# Altium PCB PCI Express Mini L1_V2.PCBDOC (part 6 of 9)
Units mm, origin at the board's own origin, x right, y up, seen from the top; angles counter-clockwise.
Board outline 70 x 83.2 mm, 6 copper layers (TopLayer, Layer 1, Layer 2, Layer 3, Layer 4, Bottom Layer), stack 0.893 mm thick; 442 components, 259 nets, 1412 pads, 870 vias.
Unrouted connection lines stored in the file: 2.
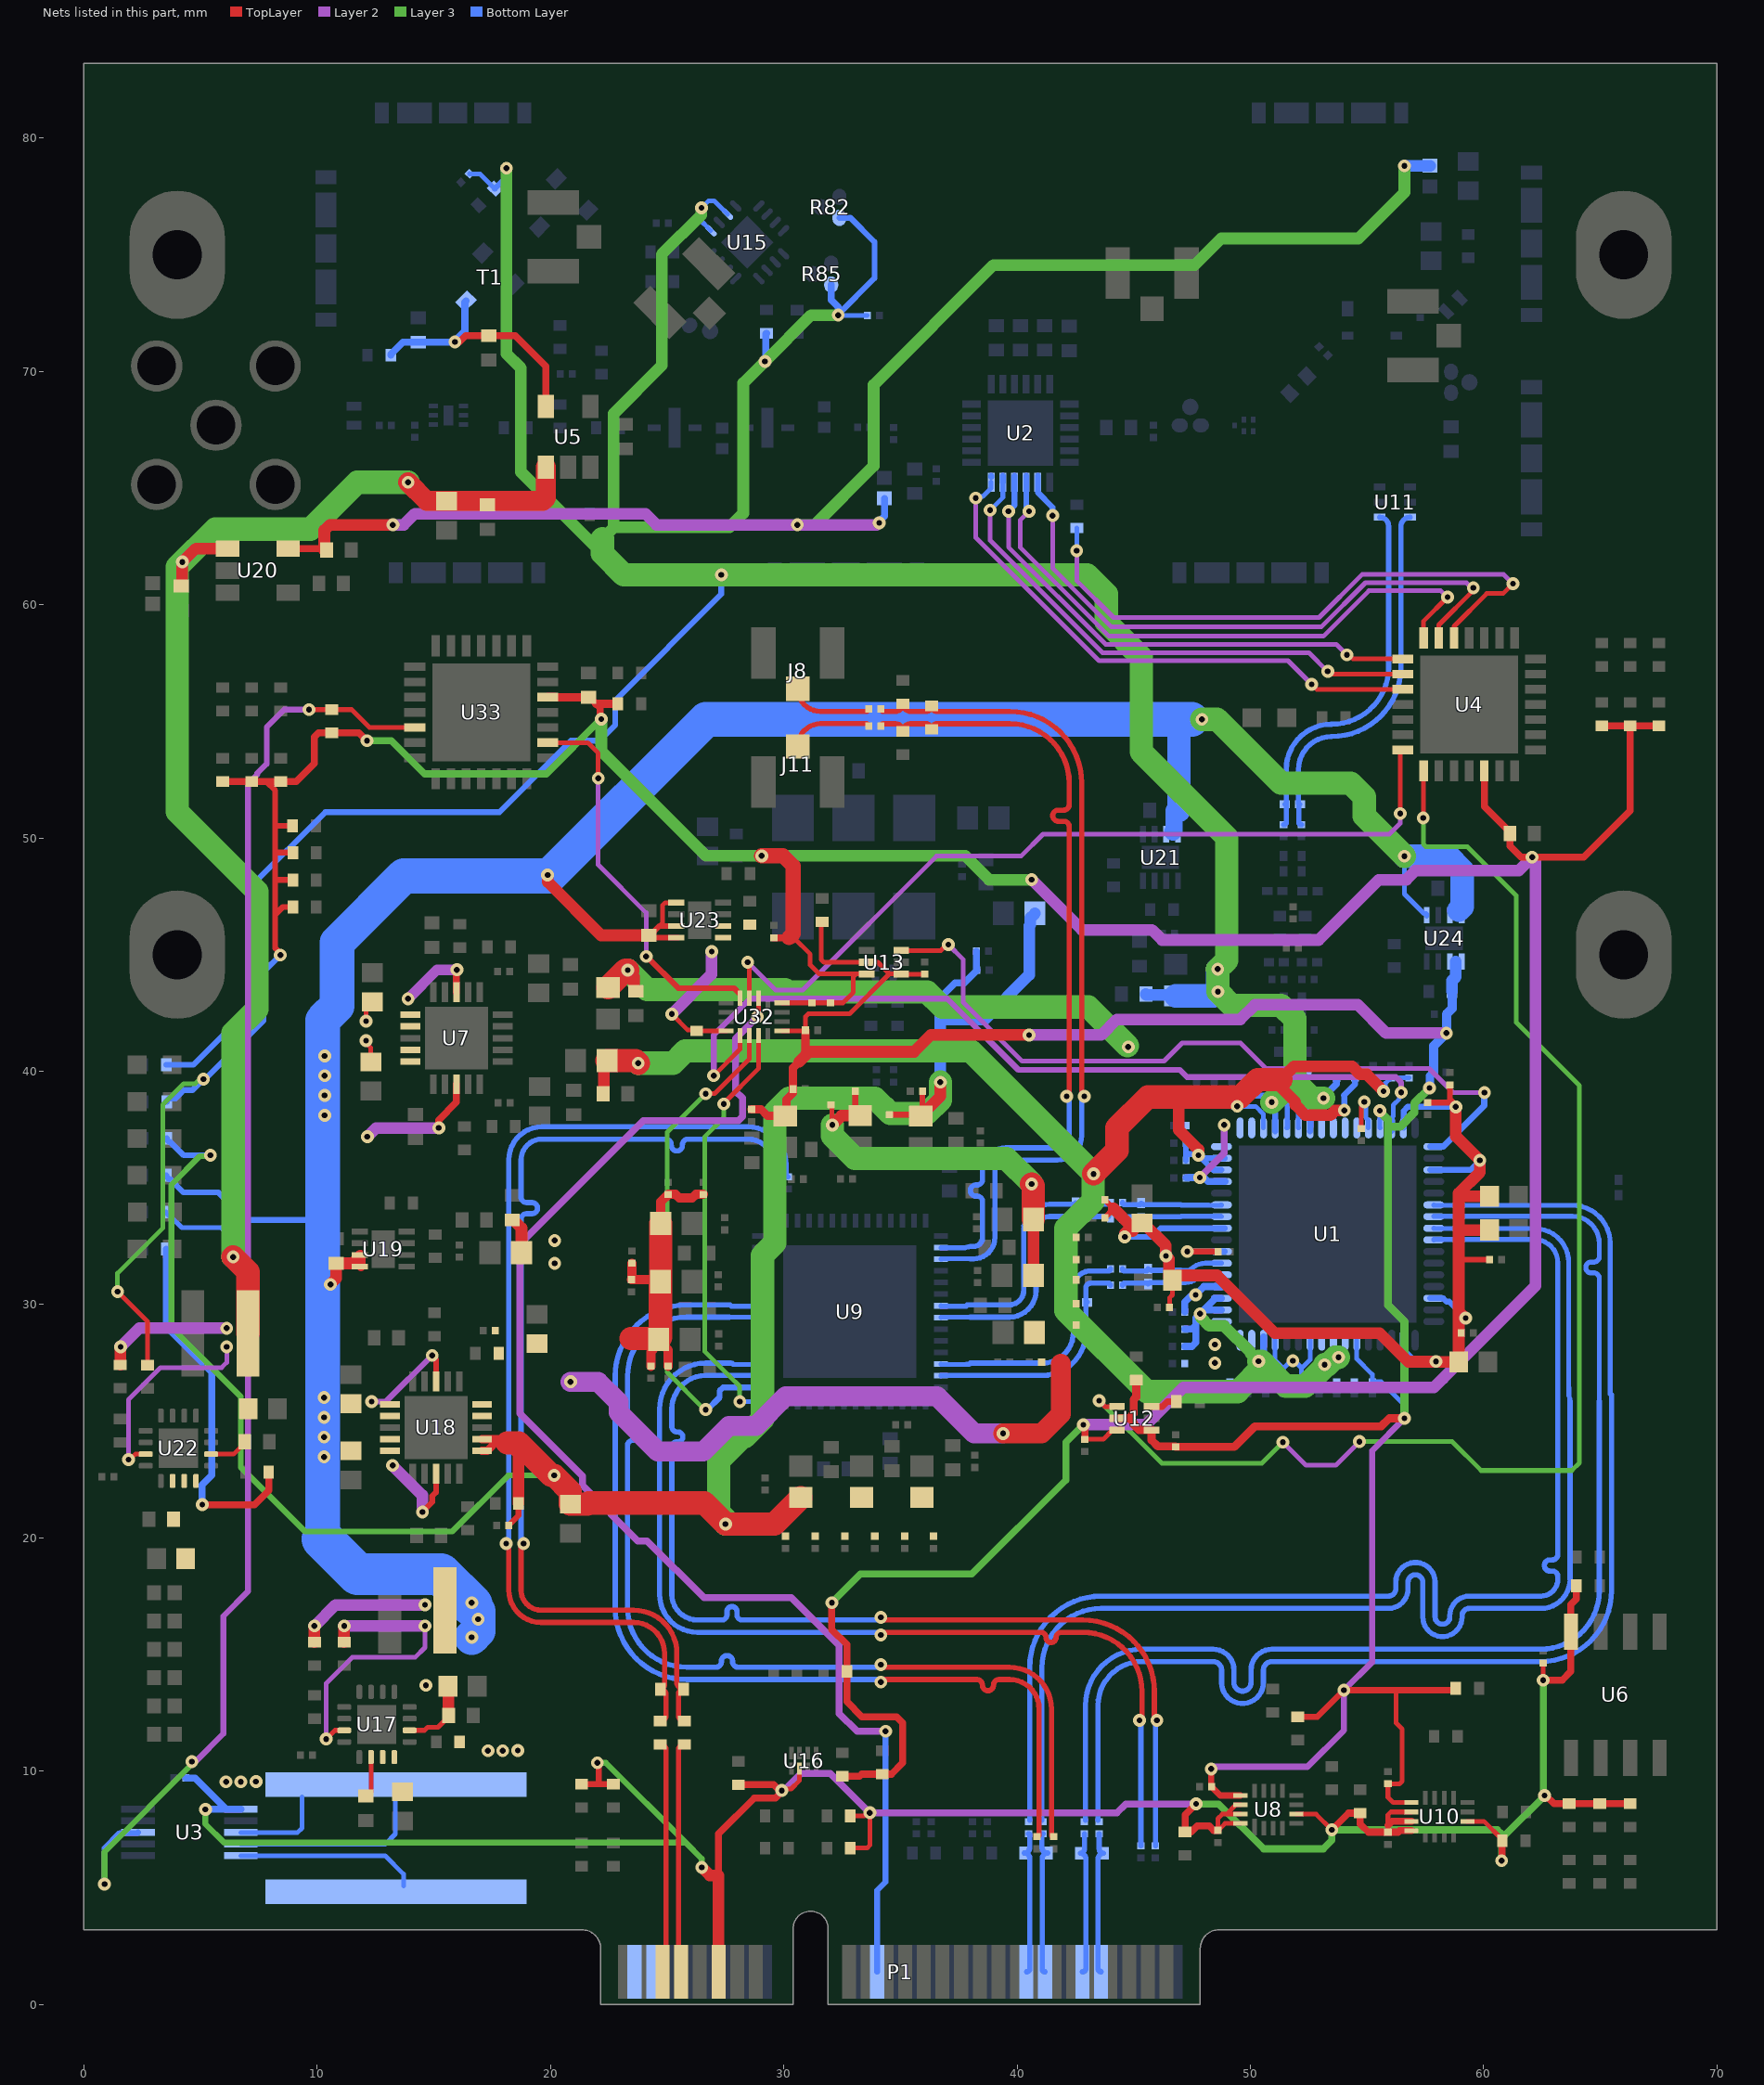
[diagram p7: the nets of this part, all layers, seen from the top]

## Part data (continued)
U12 U13: "TXB0101 (LVC1T55) DRLT Setup", Case/Package=SOT-553-6, High Level Output Current=-20uA, Low Level Output Current=20uA, Manufacturer="Texas Instruments", Max Operating Temperature=85°C, Max Supply Voltage=5.5V, Min Operating Temperature=-40°C, Min Supply Voltage=1.65V, Package Quantity=1, Supplier Part Number 1=296-32600-1-ND, Category="Integrated Circuits (ICs)", ComponentLink1Description=https://datasheet.ciiva.com/15096/getdatasheetpartid-539440-15096428.pdf?src-supplier=Verical, ComponentLink1URL=https://datasheet.ciiva.com/15096/getdatasheetpartid-539440-15096428.pdf?src-supplier=Verical, ComponentLink2Description=https://datasheet.ciiva.com/6615/txb0101-6615081.pdf?src-supplier=Digi-Key, ComponentLink2URL=https://datasheet.ciiva.com/6615/txb0101-6615081.pdf?src-supplier=Digi-Key, ComponentLink3Description=https://datasheet.ciiva.com/6615/txb0101-6615083.pdf?src-supplier=Digi-Key, ComponentLink3URL=https://datasheet.ciiva.com/6615/txb0101-6615083.pdf?src-supplier=Digi-Key, ComponentLink4Description=https://datasheet.ciiva.com/6615/txb0101-6615084.pdf?src-supplier=Digi-Key, ComponentLink4URL=https://datasheet.ciiva.com/6615/txb0101-6615084.pdf?src-supplier=Digi-Key, Contact Plating=Gold, Data Rate=100Mbps, Height=0.55mm, Lead Free="Lead Free", Length=1.7mm, Logic Function=Translator, Manufacturer Part Number=TXB0101DRLT, Mount="Surface Mount", Number of Bits=1, Number of Channels=1, Number of Pins=6, Packaging="Tape and Reel", Pricing 1="1=0,56000, 10=0,49500, 25=0,46520, 100=0,37950 (USD)", Propagation Delay=4ns, Radiation Hardening=No, RoHS=Yes, Stock 1=1962, Supplier 1=Digi-Key, Turn-On Delay Time=31ns, Weight=9.9E-05oz, Width=1.3mm
U14: Frequency="DC - 3.5GHz", Supplier Part Number 1=BGA616H6327XTSA1CT-ND, Supplier 1=Digi-Key
U15: "RF Detector 0MHz to 6000MHz 16-Pin LFCSP EP T/R", Manufacturer="Analog Devices", Operating Supply Current=4mA, Supplier Part Number 1=ADL5910ACPZN-R7CT-ND, Category="RF Semiconductors and Devices", ComponentLink1Description=https://www.analog.com/media/en/technical-documentation/data-sheets/ADL5910.pdf?src-supplier=Digi-Key, ComponentLink1URL=https://www.analog.com/media/en/technical-documentation/data-sheets/ADL5910.pdf?src-supplier=Digi-Key, Manufacturer Part Number=ADL5910ACPZN-R7, Number of Pins=16, Packaging="Cut Tape", Pricing 1="1=5,17000, 10=4,64100, 25=4,38760, 100=3,80250, 250=3,60752, 500=3,23700 (USD)", RoHS=No, Stock 1=1503, Supplier 1=Digi-Key
U16: "TEXAS INSTRUMENTS   PCA9306DQER.   IC, SMBus, 5V, X2SON-8", Low Level Output Current=128mA, Manufacturer 1="Texas Instruments", Max Operating Temperature=85°C, Max Supply Voltage=5V, Min Operating Temperature=-40°C, Min Supply Voltage=0uV, Package Quantity=1, Supplier Part Number 1=296-27957-1-ND, ComponentLink1Description=https://datasheet.ciiva.com/22631/1719693-22631024.pdf?src-supplier=Element14, ComponentLink1URL=https://datasheet.ciiva.com/22631/1719693-22631024.pdf?src-supplier=Element14, ComponentLink2Description=https://datasheet.ciiva.com/1899/pca9306-1899328.pdf?src-supplier=Digi-Key, ComponentLink2URL=https://datasheet.ciiva.com/1899/pca9306-1899328.pdf?src-supplier=Digi-Key, ComponentLink3Description=https://datasheet.ciiva.com/15095/getdatasheetpartid-306496-15095555.pdf?src-supplier=Verical, ComponentLink3URL=https://datasheet.ciiva.com/15095/getdatasheetpartid-306496-15095555.pdf?src-supplier=Verical, ComponentLink4Description=https://datasheet.ciiva.com/1504/1862428-1504149.pdf?src-supplier=Element14, ComponentLink4URL=https://datasheet.ciiva.com/1504/1862428-1504149.pdf?src-supplier=Element14, ComponentLink5Description=https://datasheet.ciiva.com/1899/pca9306-1899326.pdf?src-supplier=Digi-Key, ComponentLink5URL=https://datasheet.ciiva.com/1899/pca9306-1899326.pdf?src-supplier=Digi-Key, ComponentLink6Description=https://datasheet.ciiva.com/14287/pca9306-14287374.pdf?src-supplier=Avnet, ComponentLink6URL=https://datasheet.ciiva.com/14287/pca9306-14287374.pdf?src-supplier=Avnet, ComponentLink7Description=https://datasheet.ciiva.com/14287/pca9306-14287470.pdf?src-supplier=Avnet, ComponentLink7URL=https://datasheet.ciiva.com/14287/pca9306-14287470.pdf?src-supplier=Avnet, ComponentLink8Description=https://datasheet.ciiva.com/1899/pca9306-1899327.pdf?src-supplier=Digi-Key, ComponentLink8URL=https://datasheet.ciiva.com/1899/pca9306-1899327.pdf?src-supplier=Digi-Key, ComponentLink9Description=https://datasheet.ciiva.com/26041/pca9306-26041014.pdf?src-supplier=Avnet+Europe, ComponentLink9URL=https://datasheet.ciiva.com/26041/pca9306-26041014.pdf?src-supplier=Avnet+Europe, Height=0.35mm, Lead Free="Lead Free", Length=1.45mm, Logic Function=Translator, Manufacturer Part Number 1=PCA9306DQER, Number of Bits=2, Number of Channels=2, Number of Outputs=2, Number of Pins=8, Output Type=I2C, Packaging="Tape and Reel", Pricing 1="1=0,67000, 10=0,59100, 100=0,45340, 500=0,35844, 1000=0,28675 (USD)", Propagation Delay=0.3ns, Radiation Hardening=No, REACH SVHC="No SVHC", RoHS=Yes, Stock 1=25002, Supplier 1=Digi-Key, Turn-On Delay Time=1.4ns, Width=1.05mm
U17 U22: "IC REG BUCK ADJ 3A SYNC 16QFN", Case/Package=QFN, Manufacturer="Texas Instruments", Max Input Voltage=17V, Max Operating Temperature=125°C, Max Output Current=3A, Max Output Voltage=6V, Min Input Voltage=3V, Min Operating Temperature=-40°C, Min Output Voltage=900mV, Package Quantity=3000, Quiescent Current=17uA, Supplier Part Number 1=296-37682-1-ND, Switching Frequency=2.5MHz, Category="Voltage Regulators - Switching", ComponentLink1Description=https://datasheet.ciiva.com/4880/slvsag7-121391-4880626.pdf?src-supplier=Mouser, ComponentLink1URL=https://datasheet.ciiva.com/4880/slvsag7-121391-4880626.pdf?src-supplier=Mouser, ComponentLink2Description=https://datasheet.ciiva.com/14377/tps62130-14377867.pdf?src-supplier=Avnet, ComponentLink2URL=https://datasheet.ciiva.com/14377/tps62130-14377867.pdf?src-supplier=Avnet, ComponentLink3Description=https://datasheet.ciiva.com/41799/tps62130-41799070.pdf?src-supplier=Digi-Key, ComponentLink3URL=https://datasheet.ciiva.com/41799/tps62130-41799070.pdf?src-supplier=Digi-Key, Contact Plating=Gold, Lead Free="Lead Free", Manufacturer Part Number=TPS62130RGTR, Number of Outputs=1, Number of Pins=16, Operating Supply Voltage=17V, Output Configuration=Positive, Output Current=3A, Output Type=Adjustable, Output Voltage=6V, Packaging="Tape and Reel", Pricing 1="1=2,07000, 10=1,85500, 25=1,75000, 100=1,40000, 250=1,22500, 500=1,19000, 1000=0,94500 (USD)", REACH SVHC="No SVHC", RoHS=Yes, Stock 1=11646, Supplier 1=Digi-Key, Synchronous Rectifier=Yes
U19 U21 U23 U24: "IC REG LIN POS ADJ 500MA 8LFCSP", Case/Package=MSOP, Dropout Voltage=130mV, Manufacturer="Analog Devices", Max Input Voltage=5.5V, Max Operating Temperature=125°C, Max Output Current=500mA, Max Output Voltage=5V, Max Supply Current=210uA, Min Current Limit=550mA, Min Input Voltage=2.3V, Min Operating Temperature=-40°C, Min Output Voltage=800mV, Nominal Supply Current=45uA, Power Supply Rejection Ratio (PSRR)=60dB, Reference Voltage=500mV, Supplier Part Number 1=2457144, Accuracy=1%, ComponentLink1Description=https://datasheet.ciiva.com/17365/adp124-125-17365589.pdf?src-supplier=Avnet+Europe, ComponentLink1URL=https://datasheet.ciiva.com/17365/adp124-125-17365589.pdf?src-supplier=Avnet+Europe, ComponentLink2Description=https://datasheet.ciiva.com/2056/adp124-125-2056955.pdf?src-supplier=Digi-Key, ComponentLink2URL=https://datasheet.ciiva.com/2056/adp124-125-2056955.pdf?src-supplier=Digi-Key, ComponentLink3Description=https://datasheet.ciiva.com/2056/adp124-125-2056954.pdf?src-supplier=Digi-Key, ComponentLink3URL=https://datasheet.ciiva.com/2056/adp124-125-2056954.pdf?src-supplier=Digi-Key, ComponentLink4Description=https://datasheet.ciiva.com/2056/adp124-125-2056956.pdf?src-supplier=Digi-Key, ComponentLink4URL=https://datasheet.ciiva.com/2056/adp124-125-2056956.pdf?src-supplier=Digi-Key, ComponentLink5Description=https://datasheet.ciiva.com/48694/001251247-da-01-en-ic-reg-l-adj-adp125acpz-r7-lfcspud-8-adi-48694599.pdf?src-supplier=Conrad, ComponentLink5URL=https://datasheet.ciiva.com/48694/001251247-da-01-en-ic-reg-l-adj-adp125acpz-r7-lfcspud-8-adi-48694599.pdf?src-supplier=Conrad, ComponentLink6Description=http://datasheet.octopart.com/ADP125ACPZ-R7-Analog-Devices-datasheet-11525030.pdf?src-supplier=Newark, ComponentLink6URL=http://datasheet.octopart.com/ADP125ACPZ-R7-Analog-Devices-datasheet-11525030.pdf?src-supplier=Newark, ComponentLink7Description=http://datasheet.octopart.com/ADP125ACPZ-R7-Analog-Devices-datasheet-38878834.pdf?src-supplier=Newark, ComponentLink7URL=http://datasheet.octopart.com/ADP125ACPZ-R7-Analog-Devices-datasheet-38878834.pdf?src-supplier=Newark, ComponentLink8Description=http://datasheet.octopart.com/ADP125ACPZ-R7-Analog-Devices-datasheet-10623001.pdf?src-supplier=Analog+Devices, ComponentLink8URL=http://datasheet.octopart.com/ADP125ACPZ-R7-Analog-Devices-datasheet-10623001.pdf?src-supplier=Analog+Devices, ComponentLink9Description=http://datasheet.octopart.com/ADP125ACPZ-R7-Analog-Devices-datasheet-8638579.pdf?src-supplier=Analog+Devices, ComponentLink9URL=http://datasheet.octopart.com/ADP125ACPZ-R7-Analog-Devices-datasheet-8638579.pdf?src-supplier=Analog+Devices, ComponentLink10Description=http://datasheet.octopart.com/ADP125ACPZ-R7-Analog-Devices-datasheet-11776558.pdf?src-supplier=Arrow, ComponentLink10URL=http://datasheet.octopart.com/ADP125ACPZ-R7-Analog-Devices-datasheet-11776558.pdf?src-supplier=Arrow, Contact Plating=Gold, Height=0.6mm, Lead Free="Contains Lead", Length=2mm, Manufacturer 2="Analog Devices", Manufacturer Part Number=ADP125ACPZ-R7, Manufacturer Part Number 2=ADP125ACPZ-R7, Number of Outputs=1, Number of Pins=8, Number of Regulators=1, Operating Supply Current=45uA, Output Current=500mA, Output Type=Adjustable, Output Voltage=5V, Packaging="Tape and Reel", Polarity=Positive, Pricing 2="1=1.39000, 10=1.23900, 25=1.17600, 100=0.96600, 250=0.90300, 500=0.79800, 1000=0.63000 (USD)", Quiescent Current=45uA, REACH SVHC="No SVHC", RoHS=Yes, Stock 1=261, Stock 2=12322, Supplier 1=Farnell, Supplier 2=Digi-Key, Supplier Part Number 2=ADP125ACPZ-R7CT-ND, Width=2mm
U32: "IC TRNSLTR BIDIRECTIONAL 16UQFN", High Level Output Current=-20uA, Low Level Output Current=20uA, Manufacturer 1="Texas Instruments", Max Operating Temperature=85°C, Max Supply Voltage=3.6V, Min Operating Temperature=-40°C, Min Supply Voltage=900mV, Nominal Supply Current=5uA, Package Quantity=1, Quiescent Current=10uA, Supplier Part Number 1=296-29681-1-ND, ComponentLink1Description=https://datasheet.ciiva.com/1900/txb0304-1900817.pdf?src-supplier=Digi-Key, ComponentLink1URL=https://datasheet.ciiva.com/1900/txb0304-1900817.pdf?src-supplier=Digi-Key, ComponentLink2Description=https://datasheet.ciiva.com/15096/getdatasheetpartid-490462-15096317.pdf?src-supplier=Verical, ComponentLink2URL=https://datasheet.ciiva.com/15096/getdatasheetpartid-490462-15096317.pdf?src-supplier=Verical, ComponentLink3Description=https://datasheet.ciiva.com/1900/txb0304-1900818.pdf?src-supplier=Digi-Key, ComponentLink3URL=https://datasheet.ciiva.com/1900/txb0304-1900818.pdf?src-supplier=Digi-Key, ComponentLink4Description=https://datasheet.ciiva.com/1900/txb0304-1900819.pdf?src-supplier=Digi-Key, ComponentLink4URL=https://datasheet.ciiva.com/1900/txb0304-1900819.pdf?src-supplier=Digi-Key, ComponentLink5Description=https://datasheet.ciiva.com/14287/txb0304-14287243.pdf?src-supplier=Avnet, ComponentLink5URL=https://datasheet.ciiva.com/14287/txb0304-14287243.pdf?src-supplier=Avnet, Contact Plating=Gold, Data Rate=140Mbps, Lead Free="Lead Free", Logic Function=Translator, Manufacturer Part Number 1=TXB0304RSVR, Mount="Surface Mount", Number of Bits=4, Number of Channels=4, Number of Inputs=4, Number of Outputs=4, Number of Pins=16, Packaging="Tape and Reel", Pricing 1="1=1.45000, 10=1.29700, 100=1.01160, 500=0.83564, 1000=0.65972 (USD)", Propagation Delay=4.8ns, Radiation Hardening=No, REACH SVHC="No SVHC", RoHS=Yes, Stock 1=1758, Supplier 1=Digi-Key, Turn-On Delay Time=18.9ns
X1: "OSC VCXO 122.88MHZ LVPECL SMD", Case/Package=SMD/SMT, Frequency=122.88MHz, Manufacturer=Epson, Max Operating Temperature=85°C, Max Supply Current=65mA, Min Operating Temperature=-40°C, Supplier Part Number 1=SER3907CT-ND, ComponentLink1Description=https://datasheet.ciiva.com/29626/vg-4513ca-partnumber-29626986.pdf?src-supplier=Digi-Key, ComponentLink1URL=https://datasheet.ciiva.com/29626/vg-4513ca-partnumber-29626986.pdf?src-supplier=Digi-Key, ComponentLink2Description=https://datasheet.ciiva.com/29626/vg-4513ca-partnumber-29626987.pdf?src-supplier=Digi-Key, ComponentLink2URL=https://datasheet.ciiva.com/29626/vg-4513ca-partnumber-29626987.pdf?src-supplier=Digi-Key, ComponentLink3Description=https://datasheet.ciiva.com/29626/076-vg-4513ca-cb-e13ya-29626988.pdf?src-supplier=Digi-Key, ComponentLink3URL=https://datasheet.ciiva.com/29626/076-vg-4513ca-cb-e13ya-29626988.pdf?src-supplier=Digi-Key, Height=0.071inch, Lead Free="Lead Free", Length=0.276inch, Manufacturer Part Number=VG-4513CA122.8800M-GFCT3, Mount="Surface Mount", Packaging="Tape and Reel", Pricing 1="1 = 9,91000, 10 = 9,29000, 50 = 8,97980, 100 = 8,67020 (USD)", RoHS=Yes, Stock 1=438, Supplier 1=Digi-Key, Width=0.197inch

## Free pads (board coordinates)
  oval 4.1x5.5 hole 2.1 slot 4 at 90 deg unplated: ""(4,45) ""(4,75) ""(66,45) ""(66,75)

## Via types
v1: diameter 0.55, hole 0.25, TopLayer to Bottom Layer, tented both sides, 777 vias
v2: diameter 0.5, hole 0.2, TopLayer to Bottom Layer, 43 vias
v3: diameter 0.55, hole 0.25, TopLayer to Bottom Layer, 40 vias
v4: diameter 0.35, hole 0.2, TopLayer to Bottom Layer, 10 vias

## Nets (pads, with @x,y where several pads share a name; then routed paths per layer and width w, separated by ;. In a path a pad name is that pad's centre, name@x,y a point inside that pad or via, vN(x,y) a via of type N, cw(c..) or ccw(c..) an arc to the next point about the centre after c; other vN are vias at no path point)
1V8@0A5_COM: C20.1 C23.2 C95.2 C127.2 C136.2 C137.2 C158.2 C159.2 C239.1 C244.1 FB17.1 R36.1 R61.2 R73.2 R109.2 R128.2 U1.13 U1.38 U8.13 U10.13 U12.1 U12.5 U13.1 U13.5 U24.1 U24.2 U32.13 | length 126.1
  TopLayer w0.2: U32.13@29.924,41.736 30.9,41.736 C239.1@30.926,41.763 30.926,42.345 31.044,42.462 32.816,42.462 34.529,44.176 ; R61.2@31.639,46.41 31.596,46.368 31.596,44.795 31.714,44.678 33.552,44.678 U13.5@33.554,44.676 34.029,44.676 34.529,44.176 ; C23.2@36.035,44.161 36.028,44.169 35.041,44.169 U13.1@35.034,44.176 34.529,44.176 ; 56.25,13.473 56.25,12.063 56.507,11.806 56.507,9.576 56.389,9.458 C20.1@55.895,9.458 55.895,8.879 56.121,8.653 U10.13@56.903,8.653
  TopLayer w0.268: v1(48.319,10.099) 48.319,9.358 C244.1@48.335,9.342 48.335,9.332 48.709,8.958 U8.13@49.57,8.958 ; R73.2@52.033,12.332 52.865,12.332 v1(54.006,13.473) 56.25,13.473 58.725,13.473 R36.1@58.803,13.551
  TopLayer w0.35: C159.2@28.624,38.372 29.029,38.372 29.311,38.09 FB17.1@30.061,38.09 30.106,38.135 30.106,38.785 30.395,39.074 C158.2@30.395,39.238 30.395,40.153 30.661,40.418 ; 30.926,40.684 C239.1@30.926,41.763 ; U12.5@44.28,25.127 44.789,25.127 ; R109.2@45.1,26.77 45.1,26.033 44.994,25.927 44.994,25.332 44.789,25.127 ; v1(56.603,25.126) 55.952,25.126 55.603,24.777 50.185,24.777 49.31,23.902 C95.2@46.8,23.902 46.778,23.924 46.029,23.924 45.76,24.193 U12.1@45.76,24.627 45.225,24.627 45.02,24.832 45.02,24.922 44.815,25.127 44.789,25.127
  TopLayer w0.5: 30.661,40.418 30.926,40.684 31.082,40.839 35.587,40.839 36.304,41.556 v1(40.514,41.556)
  Layer 2 w0.268: v1(48.319,10.099) 48.413,10.192 52.449,10.192 54.006,11.75 v1(54.006,13.473) 55.221,14.688 55.221,23.745 v1(56.603,25.126)
  Layer 2 w0.5: v1(40.514,41.556) 43.606,41.556 44.275,42.225 49.57,42.225 50.195,42.85 54.604,42.85 55.816,41.639 v1(58.403,41.639)
  Layer 3 w0.35: v1(55.544,38.315) 55.544,38.281 55.895,37.93 55.895,29.982 56.603,29.274 v1(56.603,25.126) ; 55.907,37.629 56.425,37.629 57.032,38.236 57.032,38.64 v1(57.678,39.285)
  Bottom Layer w0.2: U1.38@54.558,28.475 54.558,27.671 55.221,27.008 C137.2@55.221,26.696 55.601,26.696 56.603,25.695 v1(56.603,25.126) ; v1(55.544,38.315) 55.551,38.308 55.551,37.582 U1.13@55.558,37.575
  Bottom Layer w0.35: v1(57.678,39.285) 57.689,39.297 57.689,39.805 C136.2@57.852,39.968
  Bottom Layer w0.4: C136.2@57.852,39.968 57.852,41.088 v1(58.403,41.639) C127.2@58.403,42.452 58.643,42.692 R128.2@58.643,43.425
  Bottom Layer w0.5: R128.2@58.643,43.425 58.643,43.891 58.803,44.051 58.803,44.706 58.799,44.71
1V8@1A: C56.2 C57.2 C162.2 C163.2 C181.2 C182.2 C191.2 C192.2 C199.2 C200.2 C203.2 C204.2 C211.2 C212.2 C215.2 C216.2 FB18.1 FB20.1 FB22.1 FB24.1 FB25.1 FB27.1 FB28.1 R66.2 U18.14 U18.15 | length 57.6
  TopLayer w0.2: C215.2@32.029,38.568 32.056,38.54 32.056,37.73 v1(32.084,37.702)
  TopLayer w0.25: C216.2@33.061,39.141 33.061,38.315 FB28.1@33.279,38.098
  TopLayer w0.4: C200.2@23.496,31.772 23.496,31.103 C199.2@23.466,31.073 24.622,31.073 FB24.1@24.713,30.983 ; C182.2@24.3,27.36 24.3,27.98 24.381,28.061 24.381,28.264 FB20.1@24.631,28.514 24.631,28.464 25.047,28.048 C181.2@25.047,27.36 ; FB27.1@24.723,33.48 24.723,34.404 C212.2@25.047,34.728 25.363,34.728 25.518,34.573 26.077,34.573 26.232,34.728 C211.2@26.548,34.728
  TopLayer w0.5: v1(32.084,37.702) 32.479,38.098 FB28.1@33.279,38.098 ; FB22.1@40.695,31.248 FB18.1@40.695,33.647
  TopLayer w0.85: v1(39.398,24.477) 41.049,24.477 41.876,25.304 41.876,27.46
  TopLayer w1: 23.451,28.555 24.3,28.555 24.381,28.555 24.672,28.555 24.713,28.596 FB24.1@24.713,30.983 24.723,30.994 FB27.1@24.723,33.48 ; v1(40.624,35.169) 40.695,35.098 FB18.1@40.695,33.647
  Layer 2 w0.85: v3(20.858,26.694) 22.042,26.694 22.918,25.818 22.918,25.382 24.594,23.706 26.547,23.706 27.643,24.802 28.808,24.802 30.076,26.07 36.568,26.07 38.161,24.477 v1(39.398,24.477)
  Layer 3 w1: v1(32.084,37.702) 32.084,37.233 33.047,36.27 39.536,36.27 40.624,35.182 v1(40.624,35.169)
1V25@0A5: C73.2 C74.2 C76.2 C79.2 C80.2 C81.2 C88.2 C89.2 C132.2 C133.2 C134.2 C138.2 C139.2 FB32.2 U1.15 U1.19 U1.30 U1.34 U1.57 | length 55
  TopLayer w0.2: C134.2@46.529,29.881 46.529,30.291 46.654,30.415 C80.2@46.654,31.05
  TopLayer w0.25: C139.2@43.756,33.721 43.781,33.746 43.781,33.756 44.112,34.087 44.112,34.147 43.791,34.467 43.781,34.467 43.756,34.492 C138.2@43.756,34.502 ; C132.2@57.593,38.66 58.552,38.66 ; C133.2@58.552,39.425 58.552,38.796 58.803,38.545 v1(58.803,38.477) ; 58.928,29.915 58.928,29.876 59.225,29.579 v1(59.225,29.425) ; 58.928,31.89 58.963,31.925 C89.2@60.25,31.925
  TopLayer w0.5: C76.2@18.356,33.63 18.406,33.63 18.756,33.28 FB32.2@18.756,32.23 ; 44.142,34.117 44.912,33.347 44.615,33.05 v1(44.615,32.9) ; C81.2@44.954,33.155 45.304,33.505 C81.2@45.354,33.505 45.404,33.505 46.369,32.539 46.369,32.083 46.504,31.948 46.504,31.2 C80.2@46.654,31.05 46.856,31.251 48.569,31.251 51.046,28.775 55.544,28.775 56.767,27.552 v1@57.967,27.552 ; v1(57.956,27.563) v1@57.967,27.552 ; C73.2@58.778,27.541 57.978,27.541 v1@57.967,27.552 ; v1(58.803,38.477) 58.803,37.214 v1(59.835,36.182) 59.835,35.678 58.928,34.771 58.928,34.65 ; C73.2@58.928,27.541 58.928,29.876 ; 58.928,29.915 58.928,31.89 58.928,33.232 ; C79.2@60.25,33.2 58.96,33.2 58.928,33.232 ; C74.2@60.25,34.65 58.928,34.65 ; 58.928,33.232 58.928,34.65
  Bottom Layer w0.25: v1(44.615,32.9) 45.778,32.9 46.153,33.275 U1.57@48.908,33.275 ; U1.34@56.558,28.625 56.568,28.615 56.568,28.064 57.069,27.563 v1(57.956,27.563) ; U1.15@56.558,37.575 56.568,37.584 56.568,38.305 56.74,38.477 v1(58.803,38.477) ; U1.30@57.708,30.275 58.258,30.275 58.408,30.125 58.525,30.125 v1(59.225,29.425) ; U1.19@57.709,35.775 59.428,35.775 v1(59.835,36.182)
  other v1: 46.379,32.087 20.175,32.75
  other v3: 20.175,31.769
1V25@1A: C72.2 C113.2 C114.2 C115.2 C116.2 C117.2 C118.2 C119.2 C120.2 C121.2 FB31.2 U1.1 U1.2 U1.47 U1.48 U1.49 U1.52 U1.55 U1.61 U1.64 | length 35.2
  TopLayer w0.25: v1(47.292,32.275) C121.2@48.608,32.275
  TopLayer w0.5: v3(23.306,44.341) 23.584,44.064 23.584,43.461 23.609,43.436 C72.2@23.659,43.436
  TopLayer w1: FB31.2@22.463,43.586 23.218,44.341 v3(23.306,44.341)
  Layer 2 w0.3: v1(47.834,35.449) 48.873,36.488 v1(48.873,37.702)
  Layer 3 w1: v3(23.306,44.341) 24.141,43.507 30.052,43.507 30.151,43.407 36.145,43.407 36.794,42.758 43.061,42.758 v3@44.725,41.094
  Bottom Layer w0.25: v1(47.292,32.275) U1.55@48.908,32.275 ; C114.2@47.698,38.952 47.7,38.95 48.452,38.95 C115.2@48.454,38.948
  Bottom Layer w0.3: C118.2@47.178,29.687 47.178,30.11 47.436,30.368 47.603,30.368 v1(47.651,30.416) 47.651,30.418 48.008,30.775 U1.52@48.758,30.775 ; C116.2@47.237,35.432 47.237,35.442 47.344,35.442 47.351,35.449 v1(47.834,35.449) ; v1@48.039,35.421 48.185,35.275 U1.61@48.908,35.275
  other v1: 48.48,27.499 48.48,28.289
  other v3: 44.763,41.044
2V5@1A: C68.2 C99.2 C100.2 C101.2 C102.2 C103.2 C104.2 C105.2 C106.2 C107.2 C108.2 C109.2 C110.2 C111.2 FB7.2 U1.3 U1.8 U1.9 U1.10 U1.11 U1.39 U1.40 U1.41 U1.46 U1.50 U1.51 U1.62 U1.63 | length 88.9
  TopLayer w0.5: C68.2@22.254,39.041 22.279,39.066 22.279,40.322 FB7.2@22.423,40.466 ; 46.921,38.898 46.921,37.495 47.775,36.641 v1(47.775,36.404) ; 49.259,38.898 49.429,38.728 v1(49.429,38.5) ; 50.554,39.652 50.804,39.402 51.212,39.402 51.92,38.694 51.92,38.562 52.361,38.121 53.428,38.121 53.635,38.327 v1(54.028,38.327) ; 51.316,39.652 51.878,40.213 54.354,40.213 54.7,39.867 54.992,39.867 v1(55.708,39.15)
  TopLayer w1: FB7.2@22.423,40.466 23.645,40.466 v3(23.761,40.35) ; v1(43.277,35.602) 44.278,36.603 44.278,37.573 45.603,38.898 46.921,38.898 49.259,38.898 49.566,38.898 50.319,39.652 50.554,39.652 51.316,39.652
  Layer 3 w0.5: v1@47.884,29.441 48.231,29.094 48.869,29.094 50.016,27.947 50.016,27.894 50.309,27.601 50.312,27.601 50.337,27.576 v1(50.35,27.576)
  Layer 3 w1: v3(23.761,40.35) 25.251,40.35 25.778,40.877 38.002,40.877 v1(43.277,35.602) 43.252,35.577 43.252,34.431 42.091,33.27 42.091,29.743 45.564,26.27 49.451,26.27 50.617,27.437 50.478,27.576 v1(50.35,27.576) 50.451,27.576 51.52,26.507 52.348,26.507 v1@53.222,27.381 ; v1(53.178,27.426) 53.315,27.426 53.632,27.744 v1(53.776,27.744)
  Bottom Layer w0.2: v1(49.429,38.5) 50.222,38.5 50.557,38.165 50.557,37.576 U1.3@50.558,37.575 ; C105.2@55.258,39.723 55.268,39.723 55.641,39.35 55.641,39.217 v1(55.708,39.15) 55.775,39.217 55.775,39.475 56.023,39.723 C106.2@56.033,39.723 C107.2@56.808,39.723
  Bottom Layer w0.25: C102.2@47.237,36.178 47.237,36.452 47.237,36.551 ; C100.2@47.237,36.924 47.237,36.551 ; U1.62@48.758,35.775 48.404,35.775 v1@47.904,36.275 ; U1.63@48.908,36.275 v1@47.904,36.275 ; C103.2@49.204,38.953 49.204,38.5 v1(49.429,38.5) ; 54.006,38.969 54.026,38.988 ; v1(54.028,38.327) 54.026,38.329 54.026,38.988 ; C104.2@54.483,39.723 54.483,39.446 54.026,38.988 ; 47.237,36.551 47.336,36.452 47.727,36.452 v1(47.775,36.404) v1@47.904,36.275
  Bottom Layer w0.3: C101.2@47.178,28.21 47.493,28.21 47.669,28.386 47.669,29.122 ; C99.2@47.178,28.948 47.495,28.948 47.669,29.122 ; U1.50@48.758,29.775 v1@48.007,29.775 ; U1.51@48.758,30.275 48.458,30.275 48.458,30.226 v1@48.007,29.775 ; U1.46@50.558,28.625 U1.46@50.558,28.475 50.558,27.632 50.652,27.539 C111.2@50.652,26.696 ; 47.669,29.122 47.669,29.28 47.671,29.281 47.671,29.439 v1(47.839,29.607) v1@48.007,29.775
3V3@0A5: C78.2 C83.1 C84.2 C122.2 C123.2 C124.2 C125.2 FB4.2 R49.1 R77.2 R82.2 R85.2 R93.2 U1.4 U1.7 U1.42 U1.45 U15.5 U15.7 | length 169.6
  Layer 3 w0.5: v1(18.108,78.712) 18.108,70.767 18.726,70.149 18.726,65.694 22.225,62.195 ; 22.225,62.828 22.705,63.308 ; v1(26.473,77.013) 26.463,77.004 26.463,76.713 24.766,75.016 24.766,70.254 22.705,68.193 22.705,63.308 ; v1(27.321,61.28) 28.555,61.28 28.721,61.115 ; v1(32.33,72.414) 31.173,72.414 v1(29.191,70.433) 28.263,69.504 28.263,63.919 27.668,63.325 22.721,63.325 22.705,63.308
  Layer 3 w1: 22.225,62.828 22.225,62.195 23.139,61.28 43.005,61.28 43.825,60.46 43.825,59.247 45.322,57.749 45.322,53.692 48.978,50.036 48.978,44.763 v1(48.598,44.382) ; v1@48.608,44.382 v1(48.608,43.416) 49.194,42.83 51.317,42.83 51.903,42.245 51.903,39.56 ; v1(50.912,38.677) 51.849,39.614 51.903,39.56 ; v1(53.128,38.846) 52.617,38.846 51.903,39.56
  Bottom Layer w0.2: C84.2@16.528,78.474 16.535,78.467 16.98,78.467 R49.1@17.617,77.831 ; U15.5@26.878,76.034 26.355,76.556 26.355,76.896 v1(26.473,77.013) 26.778,77.318 27.007,77.318 U15.7@27.585,76.741 ; v1(32.33,72.414) 32.337,72.408 33.571,72.408 C83.1@33.578,72.402 ; U1.45@51.058,28.475 51.058,27.621 51.414,27.266 ; C123.2@51.414,26.689 51.414,27.266 ; v1@51.796,27.686 52.204,27.278 ; v1@51.821,27.673 51.414,27.266 ; C122.2@52.183,26.701 52.183,27.261 52.558,27.637 U1.42@52.558,28.475
  Bottom Layer w0.25: R77.2@3.53,40.277 4.688,40.277 7.155,42.745 7.155,47.92 10.346,51.111 17.812,51.111 20.877,54.175 22.101,54.175 22.776,54.85 22.776,55.909 27.321,60.455 v1(27.321,61.28) ; R49.1@17.617,77.831 18.061,78.275 18.061,78.664 v1(18.108,78.712) ; v1(32.33,72.414) 32.33,72.439 33.886,73.995 33.886,75.548 32.854,76.58 32.391,76.58 R82.2@32.386,76.586 ; C125.2@49.95,38.96 50.628,38.96 v1(50.912,38.677) ; U1.4@51.058,37.425 v1@51.058,38.53 ; U1.7@52.558,37.425 52.568,37.434 52.568,37.62 52.576,37.627 52.576,38.441 52.98,38.846 v1(53.128,38.846)
  Bottom Layer w0.3: v1(29.191,70.433) 29.227,70.468 29.227,71.609 R93.2@29.257,71.639 ; R85.2@32.03,73.721 32.03,73.071 32.33,72.771 v1@32.33,72.439 ; v1(53.128,38.846) 53.128,38.897 53.687,39.456 53.687,39.698 C124.2@53.697,39.698
  Bottom Layer w0.5: C78.2@45.519,43.31 45.519,43.297 45.544,43.272 46.765,43.272 FB4.2@46.802,43.235
  Bottom Layer w1: FB4.2@46.802,43.235 48.427,43.235 v1(48.608,43.416) 48.598,43.427 v1(48.598,44.382)
  other v1: 51.816,27.593
3V3@0A5_COM: C26.2 C94.2 C97.2 C240.2 C241.2 C242.2 R22.2 R23.2 R24.2 R30.2 R33.2 R34.2 R37.1 R38.1 R42.1 R43.2 R44.2 R52.1 R63.2 R83.2 R108.2 R114.2 R124.1 R126.2 R132.2 U4.5 U12.6 U13.6 U23.1 U23.2 U32.8 U32.16 U33.5 | length 208.5
  TopLayer w0.2: v1(1.442,30.558) 2.723,29.277 R124.1@2.723,27.408 ; v1(25.197,42.454) 25.885,41.766 26.232,41.766 R108.2@26.262,41.736 U32.8@27.524,41.736 ; U23.1@27.346,45.729 U23.1@27.348,45.728 ; U32.16@29.924,42.936 C240.2@31.199,42.936 C26.2@31.952,42.936 ; 30.031,45.729 30.227,45.729 30.423,45.729 31.13,45.023 31.13,44.554 31.508,44.176 33.104,44.176 ; C26.2@31.995,42.936 32.536,42.936 32.981,43.382 32.981,44.053 33.104,44.176 ; U13.6@33.554,44.176 33.104,44.176 ; C94.2@42.9,24.224 43.692,24.224 44.095,24.627 U12.6@44.28,24.627
  TopLayer w0.25: 7.814,52.422 8.199,52.036 8.199,50.52 ; 8.199,46.716 8.525,47.042 R52.1@8.958,47.042 ; 8.215,48.206 R42.1@8.955,48.206 ; 8.215,49.384 R38.1@8.958,49.384 ; v3(8.419,44.981) 8.419,45.057 8.199,45.278 8.199,50.52 ; R37.1@8.943,50.52 8.199,50.52
  TopLayer w0.3: R30.2@5.95,52.422 R34.2@7.192,52.422 7.814,52.422 R33.2@8.436,52.422 9.105,52.422 9.88,53.197 9.88,54.329 10.056,54.504 11.778,54.504 12.107,54.175 v1(12.135,54.175) ; C242.2@21.636,56.026 21.686,56.026 21.961,55.751 22.128,55.583 22.128,55.146 v1(22.176,55.098) ; C97.2@29.571,45.729 30.031,45.729 ; v1(32.056,17.223) 32.056,16.071 32.702,15.425 R114.2@32.702,14.278 32.702,12.981 33.347,12.336 34.826,12.336 35.098,12.064 35.098,10.363 34.609,9.874 R44.2@34.221,9.874 33.336,9.874 33.252,9.79 R43.2@32.509,9.79 ; v1(42.841,24.851) 42.841,24.783 42.9,24.724 C94.2@42.9,24.224 ; U4.5@60.025,52.875 60.025,51.35 61.125,50.25 61.125,49.65 61.596,49.179 64.291,49.179 66.275,51.163 R24.2@66.275,54.81 ; R22.2@65.066,54.81 R24.2@66.275,54.81 ; R23.2@67.51,54.81 R24.2@66.275,54.81
  TopLayer w0.37: U33.5@19.88,56.041 20.145,56.041 20.155,56.031 21.496,56.031 21.501,56.026 C242.2@21.636,56.026 ; 21.961,55.751 R63.2@22.887,55.751
  TopLayer w0.65: v1(29.051,49.235) 29.96,49.235 30.395,48.8 30.395,45.897 30.227,45.729
  Layer 2 w0.5: v1(25.197,42.454) 26.897,44.153 26.897,45.125 v3(26.906,45.134) ; v1(40.624,48.214) 42.771,46.067 45.779,46.067 46.216,45.63 52.922,45.63 55.506,48.214 56.679,48.214 57.074,48.609 61.506,48.609 v1(62.076,49.179) 62.225,49.03 62.225,30.807 58.256,26.838 58.254,26.838 57.872,26.456 47.134,26.456 45.529,24.851 v1(42.841,24.851)
  Layer 3 w0.2: v1(1.442,30.558) 1.442,31.342 3.375,33.275 3.375,38.575 4.275,39.475 4.77,39.475 4.889,39.594 5.057,39.594 v1(5.124,39.661)
  Layer 3 w0.3: v1(12.135,54.175) 13.179,54.175 14.604,52.75 19.827,52.75 v1(22.176,55.098) ; v1(32.056,17.223) 33.288,18.455 38.064,18.455 42.091,22.482 42.091,24.101 v1(42.841,24.851)
  Layer 3 w0.5: v1(22.176,55.098) 22.176,53.723 26.664,49.235 v1(29.051,49.235) 37.782,49.235 38.803,48.214 v1(40.624,48.214)
  Bottom Layer w0.25: R132.2@3.55,38.687 3.55,38.737 3.65,38.837 3.925,38.837 4.199,39.111 4.199,39.192 4.655,39.192 v1(5.124,39.661) 5.189,39.661 7.7,42.173 7.7,44.262 v3(8.419,44.981)
3V3@1A_1: C53.2 C54.2 C150.2 C151.2 C154.2 C155.2 C166.2 C167.2 C195.2 C196.2 C207.2 C208.2 FB15.1 FB16.1 FB19.1 FB23.1 FB26.1 R64.2 R78.2 U18.11 U18.12 | length 99.2
  TopLayer w0.25: C53.2@18.21,20.529 18.21,20.539 18.631,20.96 R64.2@18.631,21.478 ; C154.2@34.529,38.14 35.814,38.14 FB16.1@35.866,38.088 ; FB16.1@35.941,38.163 C155.2@35.941,39.141
  TopLayer w0.35: U18.11@17.068,23.732 17.283,23.732 17.783,24.232 ; U18.12@17.068,24.232 17.783,24.232 ; 17.961,24.232 17.783,24.232
  TopLayer w0.5: 18.151,24.077 18.631,23.597 R64.2@18.631,21.478 ; FB16.1@35.866,38.088 35.916,38.088 36.116,38.288 36.116,38.338 36.708,38.929 v1(36.708,39.535)
  TopLayer w1: 18.151,24.077 18.633,24.077 v3@20.034,22.676 ; v3(20.157,22.679) 20.848,21.987 C54.2@20.848,21.449 21.588,21.449 21.639,21.5 26.597,21.5 v1(27.5,20.597) 29.594,20.597 FB15.1@30.726,21.729
  Layer 3 w0.25: v1(5.421,36.399) 5.383,36.362 4.971,36.362 3.75,35.141 3.75,29.029 6.724,26.055 6.724,23.026 9.475,20.275 15.785,20.275 18.189,22.679 v3(20.157,22.679)
  Layer 3 w1: v1(27.5,20.597) 27.5,20.787 27.201,21.086 27.201,23.311 28.228,24.337 28.327,24.337 29.085,25.096 29.085,32.113 29.621,32.649 29.621,38.238 30.231,38.849 31.394,38.849 31.398,38.852 33.901,38.852 34.565,38.188 36.122,38.188 36.708,38.774 v1(36.708,39.535)
  Bottom Layer w0.25: R78.2@3.55,37.126 3.55,37.076 3.65,36.976 3.7,36.976 4.277,36.399 v1(5.421,36.399)
  Bottom Layer w0.3: 36.708,43.041 36.708,43.156 37.34,43.789 37.735,43.789 38.281,44.336 C207.2@38.281,44.346 38.281,44.356 38.261,44.376 C208.2@38.261,45.15
  Bottom Layer w0.5: v1(36.708,39.535) 36.708,42.215 ; 36.708,43.041 36.708,42.215 ; FB26.1@40.762,46.773 40.562,46.573 40.562,46.278 40.514,46.23 40.514,44.131 38.598,42.215 36.708,42.215
3V3_MB: C19.1 C44.2 C50.2 C243.1 P1.11 R16.2 R17.1 R21.2 R27.2 R48.2 R54.2 R69.2 R72.1 R111.1 R112.1 R115.2 R116.2 U3.6 U6.8 U8.6 U8.14 U8.15 U8.16 U10.6 U10.14 U10.15 U10.16 U16.2 | length 121.1
  TopLayer w0.2: v3(29.914,9.173) 29.914,9.136 30.018,9.24 30.314,9.24 30.676,9.602 U16.2@30.676,10.109 ; R17.1@32.849,6.705 33.568,6.705 33.685,6.822 v1(33.685,8.219) 33.591,8.219 33.453,8.081 R16.2@32.849,8.081 ; U8.16@49.57,7.758 48.909,7.758 48.618,7.467 C243.1@48.608,7.467 48.608,7.973 48.793,8.158 48.97,8.158 ; U8.15@49.57,8.158 48.97,8.158 ; U8.14@49.57,8.558 49.37,8.558 48.97,8.158 ; U8.6@51.97,8.158 52.818,8.158 v1(53.489,7.488) ; C19.1@55.895,7.388 55.895,7.677 55.895,8.13 56.018,8.253 U10.14@56.903,8.253 ; U10.6@59.303,7.853 60.009,7.853 60.794,7.068 R116.2@60.794,7.018 ; v1(62.55,13.9) C50.2@62.55,14.644
  TopLayer w0.25: R111.1@21.333,9.444 22.066,9.444 ; v1(22.008,10.363) 22.066,10.306 22.066,9.444 ; R112.1@22.691,9.444 22.066,9.444
  TopLayer w0.3: 27.2,5.535 27.2,7.319 28.739,8.858 29.637,8.858 v3@29.902,9.124 ; R72.1@28.05,9.419 29.565,9.419 29.86,9.124 v3@29.902,9.124 ; v3@29.914,9.136 v3@29.902,9.124 ; v1(47.671,8.6) 47.201,8.13 R48.2@47.201,7.393 47.461,7.393 47.718,7.65 48.236,7.65 48.419,7.467 C243.1@48.608,7.467 ; v1(53.489,7.488) 54.204,8.203 R115.2@54.7,8.203 54.7,7.742 55.054,7.388 C19.1@55.895,7.388 56.328,7.388 56.393,7.453 U10.16@56.903,7.453 ; 55.895,7.677 56.071,7.853 U10.15@56.903,7.853 ; v1(60.77,6.168) 60.782,6.18 60.782,7.006 R116.2@60.794,7.018 ; v1(62.55,13.9) 63.363,13.9 63.735,14.272 U6.8@63.735,15.975 63.735,17.135 63.973,17.373 R27.2@63.973,17.943 ; v1(62.609,8.958) 62.663,8.958 63.013,8.608 R54.2@63.656,8.608 R69.2@64.973,8.608 R21.2@66.275,8.608
  TopLayer w0.5: v3(26.484,5.875) 26.824,5.535 27.2,5.535 P1.11@27.2,1.4
  Layer 2 w0.3: v3(29.914,9.173) 29.999,9.173 30.738,9.912 31.992,9.912 v1(33.685,8.219) 44.271,8.219 44.652,8.6 v1(47.671,8.6)
  Layer 3 w0.25: v1(5.207,8.364) 5.207,7.743 6.01,6.94 25.795,6.94 ; v1(22.008,10.363) 22.372,10.363 25.795,6.94 ; v3(26.484,5.875) 26.484,6.251 25.795,6.94
  Layer 3 w0.3: v1(47.671,8.6) 48.631,8.6 50.558,6.673 53.125,6.673 53.489,7.036 v1(53.489,7.488) 60.594,7.488 60.77,7.312 60.77,7.12 ; v1(60.77,6.168) 60.77,7.12 ; v1(62.55,13.9) 62.55,9.194 62.561,9.183 62.561,9.006 v1(62.609,8.958) 60.866,7.216 60.77,7.12
  Bottom Layer w0.3: C44.2@4.372,9.708 4.76,9.708 U3.6@6.093,8.375 ; v1(5.207,8.364) 5.218,8.375 U3.6@6.093,8.375 ; U3.6@6.724,8.375 U3.6@6.093,8.375
3V6_DCDC: C40.2 C43.2 C48.2 C49.2 C52.2 C55.2 C62.2 C65.2 C96.2 C126.2 L5.2 R118.2 R120.1 R133.2 U7.1 U7.2 U7.4 U7.5 U7.8 U7.18 U17.7 U17.14 U18.1 U18.2 U18.4 U18.5 U18.8 U18.18 U19.7 U19.8 U21.7 U21.8 U23.5 U23.7 U23.8 U24.5 U24.7 U24.8 | length 162.6
  TopLayer w0.2: v1(10.385,11.381) 10.758,11.753 U17.7@11.156,11.753 ; v1(12.092,41.312) 12.092,41.217 12.298,41.012 C40.2@12.298,40.406 ; v1(12.092,42.151) 12.092,42.708 C43.2@12.362,42.978 ; U17.14@13.956,11.753 14.603,11.753 14.731,11.881 15.177,11.881 15.635,12.339 C49.2@15.635,12.389 ; 24.671,46.229 24.796,46.354 24.796,47.112 24.913,47.229 U23.5@25.446,47.229
  TopLayer w0.25: v1(14.508,21.113) 14.933,21.538 14.933,21.797 15.093,21.957 U18.8@15.093,22.757 ; v1(14.926,27.821) 15.095,27.652 15.095,26.709 U18.18@15.093,26.707 ; U23.8@25.446,45.729 24.321,45.729 C96.2@24.221,45.829 24.271,45.829 24.671,46.229 U23.7@25.446,46.229
  TopLayer w0.3: v1(15.21,37.575) 15.21,37.913 15.97,38.673 U7.8@15.97,39.448 ; U7.18@15.97,43.398 15.97,44.312 15.987,44.328 v1(15.987,44.354)
  TopLayer w0.4: U19.8@11.877,31.63 U19.7@11.877,32.13
  TopLayer w0.5: R118.2@9.881,15.528 v1(9.881,16.225) ; v1(10.568,30.867) 10.568,30.88 10.806,31.118 C62.2@10.806,31.77 11.517,31.77 U19.7@11.852,32.105 ; R120.1@11.156,15.528 11.157,15.529 11.157,16.223 v1(11.158,16.225) ; C48.2@15.606,13.643 15.62,13.628 15.62,12.404 C49.2@15.635,12.389 ; v1(19.875,48.416) 19.884,48.406 19.884,48.111 22.166,45.829 C96.2@24.221,45.829
  Layer 2 w0.2: v1(10.385,11.381) 10.385,13.765 11.498,14.878 14.193,14.878 14.619,15.304 v1(14.619,16.225)
  Layer 2 w0.25: v1(12.336,25.845) 12.95,25.845 v1(14.926,27.821)
  Layer 2 w0.45: v1(13.892,43.111) 15.135,44.354 v1(15.987,44.354)
  Layer 2 w0.5: v1(9.881,16.225) 10.788,17.131 v1(14.619,17.131) ; v1(11.158,16.225) v1(14.619,16.225) ; v1(12.148,37.198) 12.525,37.575 v1(15.21,37.575) ; v1(13.232,23.107) 14.508,21.832 v1(14.508,21.113)
  Layer 3 w1: v1(47.921,55.09) 48.571,55.09 51.311,52.35 54.298,52.35 54.883,51.764 54.883,50.941 v1(56.601,49.223)
  Bottom Layer w0.2: v1(56.601,49.223) 56.601,47.601 57.44,46.762 57.528,46.762 57.553,46.737 U24.5@57.553,46.65
  Bottom Layer w0.25: R133.2@3.531,35.543 3.531,35.493 3.631,35.393 3.681,35.393 4.263,34.81 5.764,34.81 6.942,33.632 10.229,33.632
  Bottom Layer w0.75: 46.676,50.266 46.727,50.318 C65.2@46.727,51.185
  Bottom Layer w1: 46.428,55.09 46.942,54.576 C65.2@46.942,51.185 ; 47.488,55.09 v1(47.921,55.09) ; v1(56.601,49.223) 58.492,49.223 59.078,48.637 C126.2@59.078,47.85 59.078,47.052 58.924,46.898
  Bottom Layer w1.5: 10.229,19.953 10.229,33.632 10.229,42.185 10.854,42.809 10.854,45.515 13.711,48.372 v1@19.875,48.372 ; v1(16.623,15.741) 16.894,16.012 v3(16.894,16.514) 16.894,16.852 16.623,17.123 v1(16.623,17.223) ; v1@19.947,48.372 26.665,55.09 46.428,55.09 47.488,55.09
  Bottom Layer w1.8: 10.229,19.953 11.732,18.45 15.296,18.45 v1@16.623,17.123
  other v1: 10.296,23.472 10.296,24.32 10.296,26.017 10.318,38.116 10.318,38.965 10.318,40.662
  other v3: 14.658,13.686 10.296,25.169 10.318,39.813
5V: C61.2 FB2.1 FB3.1 U20.5 | length 64
  TopLayer w0.3: U20.5@8.758,62.412 8.77,62.401 C61.2@10.223,62.401 ; C61.2@10.304,62.34 C61.2@10.317,62.327
  TopLayer w0.5: C61.2@10.304,62.34 10.304,63.195 10.534,63.425 v1(13.242,63.425)
  Layer 2 w0.5: v1(13.242,63.425) 13.711,63.425 14.186,63.9 24.065,63.9 24.54,63.425 v1(30.581,63.425) 33.988,63.425 34.075,63.512 v1(34.088,63.512)
  Layer 3 w0.5: v1(30.581,63.425) 30.586,63.419 31.322,63.419 33.85,65.947 33.85,69.425 38.983,74.558 47.605,74.558 48.747,75.7 54.625,75.7 56.6,77.675 v1(56.6,78.815)
  Bottom Layer w0.3: v1(34.088,63.512) 34.088,63.58 34.309,63.8 FB2.1@34.309,64.56
  Bottom Layer w0.5: v1(56.6,78.815) FB3.1@57.702,78.815
5V_ANT: C24.2 C30.2 R31.1 T1.3 U5.5 | length 11.3
  TopLayer w0.3: v1(15.905,71.262) 16.089,71.262 16.364,71.537 C24.2@17.355,71.537 18.48,71.537 19.805,70.212 U5.5@19.805,68.501
  Bottom Layer w0.3: R31.1@13.156,70.695 13.156,70.745 13.667,71.256 C30.2@14.335,71.256 v1@15.851,71.256 ; v1(15.905,71.262) 15.857,71.262 v1@15.851,71.256 ; T1.3@16.373,73.016 16.329,72.972 16.329,71.734 v1@15.851,71.256
6V_DCDC: C37.2 C60.2 C70.2 C91.2 C92.2 L6.2 R76.2 R122.2 U5.1 U20.1 U22.7 U22.14 | length 77.6
  TopLayer w0.2: v1(1.914,23.354) 1.966,23.354 2.203,23.592 U22.7@2.65,23.592 ; U22.14@5.45,23.592 6.41,23.592 6.896,24.077 C92.2@6.896,24.127
  TopLayer w0.5: R122.2@1.56,27.417 1.566,27.423 1.566,28.185 v1(1.572,28.192) ; C60.2@4.175,60.8 4.184,60.8 4.209,60.825 4.209,61.823 v1(4.218,61.833) 4.798,62.412 U20.1@6.158,62.412
  TopLayer w0.85: v1(13.892,65.25) 14.695,64.448 C37.2@15.545,64.448 19.679,64.448 19.805,64.574 U5.1@19.805,65.901
  TopLayer w1: v1(6.396,32.042) 7.035,31.403 L6.2@7.035,28.77
  Layer 2 w0.2: v1(1.914,23.354) 1.914,25.931 3.284,27.3 5.9,27.3 6.12,27.52 v1(6.12,28.192)
  Layer 2 w0.5: v1(1.572,28.192) 2.372,28.992 v1(6.12,28.992)
  Layer 3 w1: v1(6.396,32.042) 6.396,41.648 7.421,42.673 7.421,47.708 4,51.129 4,61.614 5.625,63.24 9.71,63.24 11.72,65.25 v1(13.892,65.25)
  Bottom Layer w0.2: R76.2@3.531,33.968 3.531,33.918 3.656,33.793 3.706,33.793 4.199,33.3 5.89,33.3 6.396,32.794 v1(6.396,32.042)
12V: C27.2 C29.2 C87.2 C90.2 R15.2 R62.2 R80.2 R123.2 U3.8 U3.9 U17.10 U17.11 U17.12 U22.10 U22.11 U22.12 | length 30.6
  TopLayer w0.2: C29.2@12.089,8.941 12.131,8.941 12.306,9.116 U17.10@12.306,10.603
  TopLayer w0.3: v1(5.07,21.425) 7.319,21.425 7.921,22.026 R123.2@7.921,22.822
  Bottom Layer w0.2: U3.9@6.724,6.875 12.917,6.875 13.349,7.307 R15.2@13.349,9.402 ; U3.8@6.724,7.375 9.159,7.375 9.355,7.57 R15.2@9.355,8.907
  Bottom Layer w0.3: R80.2@3.53,32.38 3.53,29.062 5.487,27.106 5.487,22.691 5.07,22.274 v1(5.07,21.425)
  other v1: 6.093,9.548 7.375,9.557 17.319,10.875 17.95,10.875 18.601,10.884
  other v3: 6.724,9.548
04610_RESET: U9.15 U32.10 | length 21.3
  TopLayer w0.2: v1(26.649,39.041) 27.032,39.041 28.524,40.533 U32.10@28.524,41.536
  Layer 3 w0.2: v1(26.649,25.5) 26.606,25.5 25.001,27.105 25.001,37.393 v1(26.649,39.041)
  Bottom Layer w0.25: v1(26.649,25.5) 26.727,25.5 27.249,26.022 27.249,26.303 27.395,26.45 27.659,26.45 U9.15@28.931,26.45
04610_RESET_3.3: U4.28 U32.3 | length 36.2
  TopLayer w0.2: v1(28.451,44.676) 28.524,44.603 U32.3@28.524,43.136 ; v1(56.425,51.05) 56.425,53.675 U4.28@56.525,53.775
  Layer 2 w0.2: v1(28.451,44.676) 29.641,43.486 30.809,43.486 36.545,49.223 40.168,49.223 41.106,50.161 55.958,50.161 56.425,50.628 v1(56.425,51.05)
04610_STATUS0: R74.2 U12.3 | length 1.2
  TopLayer w0.268: U12.3@45.76,25.627 46.222,25.627 46.44,25.845 R74.2@46.829,25.845
04610_STATUS0_3V3: U4.1 U12.4 | length 57.9
  TopLayer w0.2: v3(43.516,25.885) 43.774,25.627 U12.4@44.28,25.627 ; v1(57.408,50.86) 57.425,50.877 U4.1@57.425,52.875
  Layer 2 w0.2: v1(51.393,24.101) 52.381,23.112 53.654,23.112 v1(54.669,24.127)
  Layer 3 w0.2: v3(43.516,25.885) 46.205,23.196 50.488,23.196 v1(51.393,24.101) ; v1(54.669,24.127) 58.651,24.127 59.888,22.89 63.775,22.89 64.096,23.211 64.096,39.393 61.392,42.097 61.392,47.533 59.296,49.629 57.526,49.629 57.408,49.746 v1(57.408,50.86)
04610_SYNC: U9.14 U32.11 | length 18.8
  TopLayer w0.2: v1(27.426,38.602) 27.426,38.634 28.924,40.132 U32.11@28.924,41.536
  Layer 3 w0.2: v1(27.426,38.602) 27.426,38.01 26.606,37.19 26.606,28 27.659,26.947 28.11,26.496 v1(28.11,25.845)
  Bottom Layer w0.2: v1(28.11,25.845) 29.536,25.845 U9.14@29.581,25.8
04610_SYNC_3V3: P1.20 U32.2 | length 58.4
  TopLayer w0.2: v1(28.869,42.336) 28.924,42.391 U32.2@28.924,43.136
  Layer 2 w0.3: v1(28.869,42.336) 27.933,41.4 27.933,39.143 28.225,38.851 28.225,38.068 28.05,37.892 23.983,37.892 18.686,32.595 18.686,25.332 21.364,22.653 21.364,22.245 23.734,19.875 24.143,19.875 26.573,17.445 30.317,17.445 32.375,15.387 32.375,12.476 33.141,11.711 v1(34.361,11.711)
  Bottom Layer w0.25: P1.20@34,1.4 34,4.891 34.361,5.252 v1(34.361,11.711)
9690_FAST_DETECT: U1.17 U13.3 | length 33.1
  TopLayer w0.2: U13.3@35.034,45.176 36.723,45.176 36.983,45.436 v1(37.05,45.436)
  Layer 2 w0.2: v1(37.05,45.436) 37.683,44.803 37.683,42.964 40.209,40.438 46.302,40.438 47.076,41.212 49.576,41.212 50.575,40.213 50.663,40.125 57.651,40.125 58.253,39.524 58.688,39.088 v1(60.029,39.088)
  Bottom Layer w0.279: U1.17@57.708,36.775 58.268,36.775 60.029,38.535 v1(60.029,39.088)
9690_PDWN: U1.14 U32.9 | length 37.8
  TopLayer w0.2: v1(26.994,39.816) 28.124,40.946 U32.9@28.124,41.536
  Layer 2 w0.25: v1(26.994,39.816) 26.994,41.556 28.549,43.111 37.006,43.111 40.054,40.063 46.973,40.063 47.006,40.03 47.286,39.75 56.231,39.75 56.425,39.556 56.458,39.523 v1(56.458,39.098)
  Bottom Layer w0.2: U1.14@56.058,37.425 56.078,37.444 56.078,38.035 56.119,38.077 56.119,38.553 56.391,38.825 56.391,39.031 v1(56.458,39.098)
9690_PDWN_3.3: U32.4 U33.2 | length 16.6
  TopLayer w0.2: U33.2@19.88,54.091 21.602,54.091 22.045,53.648 v1(22.045,52.562)
  TopLayer w0.25: v1(24.101,44.927) 24.12,44.927 25.485,43.561 27.874,43.561 U32.4@28.099,43.336
  Layer 2 w0.2: v1(22.045,52.562) 22.045,48.854 24.101,46.797 v1(24.101,44.927)
9690_V_1P0: C69.2 U1.12 | length 2.4
  TopLayer w0.2: C69.2@54.753,37.547 54.753,38.468 54.883,38.599 v1(54.883,38.694)
  Bottom Layer w0.2: v1(54.883,38.694) 54.95,38.627 54.95,38.01 55.058,37.902 U1.12@55.058,37.575
+12: P1.2 P1.4 R15.1 U3.10 | length 7.8
  Bottom Layer w0.2: U3.10@6.724,6.375 12.917,6.375 13.699,5.593 R15.1@13.699,5.074
ADC_CLK9690_N: C187.2 R14.1 U1.54 | length 4.3
  Bottom Layer w0.21: 47.006,31.473 47.341,31.473 ccw(c47.341,31.628) 47.451,31.518 47.452,31.52 cw(c48.067,30.905) 48.067,31.775 U1.54@48.758,31.775
  Bottom Layer w0.223: C187.2@44.518,31.534 ccw(c44.606,31.534) 44.606,31.446 45.526,31.446 ccw(c45.526,31.534) R14.1@45.614,31.534 ; R14.1@45.761,31.473 47.006,31.473
ADC_CLK9690_P: C186.2 R14.2 U1.53 | length 4.4
  Bottom Layer w0.21: 47.006,30.945 47.214,30.945 ccw(c47.214,31.737) 47.774,31.177 47.783,31.186 cw(c47.997,30.973) 47.997,31.275 U1.53@48.758,31.275
  Bottom Layer w0.223: C186.2@44.518,30.83 cw(c44.606,30.83) 44.606,30.918 45.58,30.918 cw(c45.58,30.884) R14.2@45.614,30.884 cw(c45.761,30.737) 45.761,30.945 47.006,30.945
adc_Sysref_N: C185.2 R101.1 U1.59 | length 4.4
  Bottom Layer w0.21: 47.006,34.29 ccw(c47.076,34.36) 47.076,34.261 48.204,34.261 48.206,34.26 48.722,34.26 ccw(c48.722,34.311) U1.59@48.758,34.275
  Bottom Layer w0.223: C185.2@44.517,34.373 ccw(c44.6,34.373) 44.6,34.29 45.256,34.29 ccw(c45.256,34.351) R101.1@45.317,34.351 ccw(c45.465,34.499) 45.465,34.29 47.006,34.29
adc_Sysref_P: C183.2 R101.2 U1.58 | length 4.4
  Bottom Layer w0.21: 47.006,33.762 cw(c47.076,33.692) 47.076,33.791 48.01,33.791 48.011,33.79 48.722,33.79 cw(c48.722,33.738) U1.58@48.758,33.775
  Bottom Layer w0.223: C183.2@44.517,33.677 cw(c44.603,33.677) 44.603,33.762 45.256,33.762 cw(c45.256,33.701) R101.2@45.317,33.701 cw(c45.465,33.554) 45.465,33.762 47.006,33.762
Alert: R83.1 U3.3 U33.19 | length 62.8
  TopLayer w0.2: v1(9.647,55.504) R83.1@10.618,55.504 11.475,55.504 12.239,54.741 U33.19@14.18,54.741
  Layer 2 w0.25: v1(4.63,10.411) 4.779,10.411 5.975,11.607 5.975,16.649 7.035,17.708 7.035,52.328 7.435,52.728 7.435,52.781 7.835,53.181 7.835,54.756 8.583,55.504 v1(9.647,55.504)
  Layer 3 w0.25: v1(0.883,5.164) 0.883,6.551 4.63,10.297 v1(4.63,10.411)
  Bottom Layer w0.25: v1(0.883,5.164) 0.883,6.698 1.535,7.35 2.299,7.35 U3.3@2.324,7.375
AN_IN_9690_N: R4.2 U1.5 | length 2.4
  Bottom Layer w0.21: R4.2@51.279,39.841 cw(c51.279,39.541) 51.579,39.541 51.579,37.595 cw(c51.558,37.595) U1.5@51.558,37.575
AN_IN_9690_P: R13.2 U1.6 | length 2.4
  Bottom Layer w0.21: U1.6@52.058,37.575 52.049,37.575 52.049,39.541 cw(c52.349,39.541) R13.2@52.349,39.841
AN_IN_N: C3.1 R7.2 U11.4 | length 16.1
  Bottom Layer w0.223: C3.1@51.42,50.568 ccw(c51.42,50.692) 51.543,50.692 51.543,51.381 ccw(c51.473,51.381) R7.2@51.473,51.452 ccw(c51.473,51.513) 51.534,51.513 51.534,52.937 cw(c53.475,52.937) 53.475,54.878 ccw(c53.475,57.329) 55.926,57.329 55.926,63.364 ccw(c55.54,63.364) U11.4@55.54,63.75
AN_IN_P: C6.1 R7.1 U11.3 | length 16
  Bottom Layer w0.223: C6.1@52.195,50.568 cw(c52.195,50.692) 52.071,50.692 52.071,51.4 cw(c52.123,51.4) R7.1@52.123,51.452 cw(c52.123,51.513) 52.062,51.513 52.062,52.937 cw(c53.475,52.937) 53.475,54.35 ccw(c53.475,57.329) 56.454,57.329 56.454,63.364 cw(c56.84,63.364) U11.3@56.84,63.75
ATT_V1: R39.2 U4.19 | length 26.5
  TopLayer w0.2: U4.19@58.725,58.575 58.725,59.076 60.128,60.479 60.829,60.479 v1(61.253,60.903)
  Layer 2 w0.2: v1(42.552,62.312) 42.552,61.032 44.133,59.45 52.938,59.45 54.786,61.297 60.859,61.297 v1(61.253,60.903)
  Bottom Layer w0.2: v1@42.552,62.222 v1(42.552,62.312) ; R39.2@42.562,63.287 42.552,63.277 v1(42.552,62.312) ; v1@42.64,62.312 v1(42.552,62.312)
ATT_V2: U2.20 U4.20 | length 26.9
  TopLayer w0.2: U4.20@58.075,58.575 58.075,59.137 59.553,60.615 v1(59.553,60.722)
  Layer 2 w0.2: v1(41.521,63.823) 41.521,61.567 44.038,59.05 53.033,59.05 54.931,60.947 59.261,60.947 59.486,60.722 v1(59.553,60.722)
  Bottom Layer w0.25: U2.20@40.889,65.525 40.889,64.811 41.521,64.179 v1(41.521,63.823)
ATT_V3: U2.21 U4.21 | length 26.3
  TopLayer w0.2: U4.21@57.425,58.575 57.425,59.3 v1(58.453,60.328)
  Layer 2 w0.2: v1(40.514,64.004) 40.13,63.62 40.13,62.463 43.943,58.65 53.128,58.65 55.076,60.597 58.161,60.597 58.431,60.328 v1(58.453,60.328)
  Bottom Layer w0.25: U2.21@40.389,65.525 U2.21@40.389,65.25 40.389,64.129 v1(40.514,64.004)
ATT_V4: U2.22 U4.22 | length 22
  TopLayer w0.2: v1(54.135,57.849) 54.23,57.849 54.403,57.675 U4.22@56.525,57.675
  Layer 2 w0.2: v1(39.631,64.004) 39.631,62.467 43.798,58.3 53.684,58.3 v1(54.135,57.849)
  Bottom Layer w0.25: v1(39.631,64.004) 39.889,64.261 U2.22@39.889,65.25 U2.22@39.889,65.525
ATT_V5: U2.23 U4.23 | length 23
  TopLayer w0.2: v1(53.313,57.141) 53.408,57.141 53.525,57.025 U4.23@56.525,57.025
  Layer 2 w0.2: v1(38.846,64.055) 38.846,62.757 43.653,57.95 52.505,57.95 v1(53.313,57.141)
  Bottom Layer w0.2: v1(38.846,64.055) 39.389,64.598 U2.23@39.389,65.25
  Bottom Layer w0.25: U2.23@39.389,65.25 U2.23@39.389,65.525
ATT_V6: U2.24 U4.24 | length 23.8
  TopLayer w0.2: v1(52.624,56.585) 52.834,56.375 U4.24@56.525,56.375
  Layer 2 w0.2: v1(38.228,64.575) 38.228,62.881 43.508,57.6 51.609,57.6 v1(52.624,56.585)
  Bottom Layer w0.2: v1(38.228,64.575) 38.295,64.642 38.531,64.642 38.889,65 U2.24@38.889,65.25
  Bottom Layer w0.25: U2.24@38.889,65.475 U2.24@38.889,65.525
CLKin1_1_N: C225.1 R94.2 R95.1 | length 44.3
  TopLayer w0.223: v1(18.846,19.761) ccw(c18.846,19.65) 18.735,19.65 18.735,17.767 ccw(c19.599,17.767) 19.599,16.903 23.565,16.903 cw(c23.565,15.053) 25.415,15.053 25.415,13.811 ccw(c25.707,13.811) R95.1@25.707,13.519 ccw(c25.707,13.295) 25.483,13.295 25.483,12.403 ccw(c25.738,12.403) R94.2@25.738,12.149
  Bottom Layer w0.223: v1(18.846,19.761) cw(c18.846,19.872) 18.735,19.872 18.735,33.07 18.735,33.659 cw(c18.974,33.659) 18.974,33.897 19.203,33.897 ccw(c19.203,34.136) 19.442,34.136 ccw(c19.203,34.136) 19.203,34.375 18.974,34.375 cw(c18.974,34.613) 18.735,34.613 18.735,35.33 18.735,36.195 cw(c19.635,36.195) 19.635,37.094 24.349,37.094 24.938,37.094 cw(c24.938,36.856) 25.177,36.856 25.177,36.826 ccw(c25.415,36.826) 25.415,36.587 ccw(c25.415,36.826) 25.654,36.826 25.654,36.856 cw(c25.892,36.856) 25.892,37.094 26.303,37.094 28.458,37.094 cw(c28.458,35.989) 29.564,35.989 29.564,35.576 cw(c29.468,35.576) C225.1@29.468,35.48
CLKin1_1_P: C226.1 R95.2 R96.2 | length 44.3
  TopLayer w0.223: v1(18.096,19.761) cw(c18.096,19.65) 18.207,19.65 18.207,17.767 ccw(c19.599,17.767) 19.599,16.375 23.565,16.375 cw(c23.565,15.053) 24.887,15.053 24.887,13.699 cw(c24.707,13.699) R95.2@24.707,13.519 cw(c24.707,13.271) 24.955,13.271 24.955,12.403 cw(c24.701,12.403) R96.2@24.701,12.149
  Bottom Layer w0.223: v1(18.096,19.761) ccw(c18.096,19.872) 18.207,19.872 18.207,36.195 cw(c19.635,36.195) 19.635,37.622 28.458,37.622 cw(c28.458,35.989) 30.092,35.989 30.092,35.576 ccw(c30.187,35.576) C226.1@30.187,35.48
CLKin1_N: P1.7 R94.1 | length 10
  TopLayer w0.223: P1.7@25.6,1.4 cw(c25.6,1.517) 25.483,1.517 25.483,10.895 cw(c25.738,10.895) R94.1@25.738,11.149
CLKin1_P: P1.5 R96.1 | length 10
  TopLayer w0.223: R96.1@24.701,11.149 cw(c24.701,10.895) 24.955,10.895 24.955,1.555 cw(c24.8,1.555) P1.5@24.8,1.4
CLKout1_N: C189.1 U9.17 | length 43.7
  TopLayer w0.223: v1(34.157,15.843) cw(c34.268,15.843) 34.268,15.954 40.479,15.954 41.017,15.954 cw(c41.017,15.731) 41.24,15.731 ccw(c41.453,15.731) 41.453,15.518 ccw(c41.453,15.731) 41.667,15.731 cw(c41.89,15.731) 41.89,15.954 42.432,15.954 42.814,15.954 cw(c42.814,13.414) 45.354,13.414 45.354,12.293 cw(c45.243,12.293) v1(45.243,12.182)